# Altium PCB PCB_Flex_USB_v2.0.PcbDoc
Units mil, origin at the board's own origin, x right, y up, seen from the top; angles counter-clockwise.
Board outline 196.54 x 2163.96 mil, 2 copper layers (Top Layer, Bottom Layer), stack 3.756 mil thick; 4 components, 4 nets, 16 pads, 8 vias.
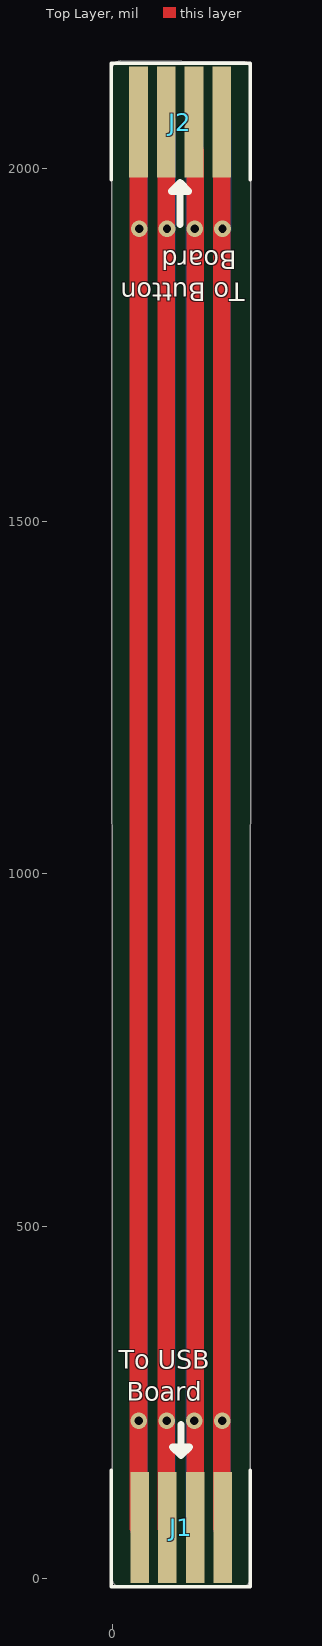
[diagram p0: Top Layer view]
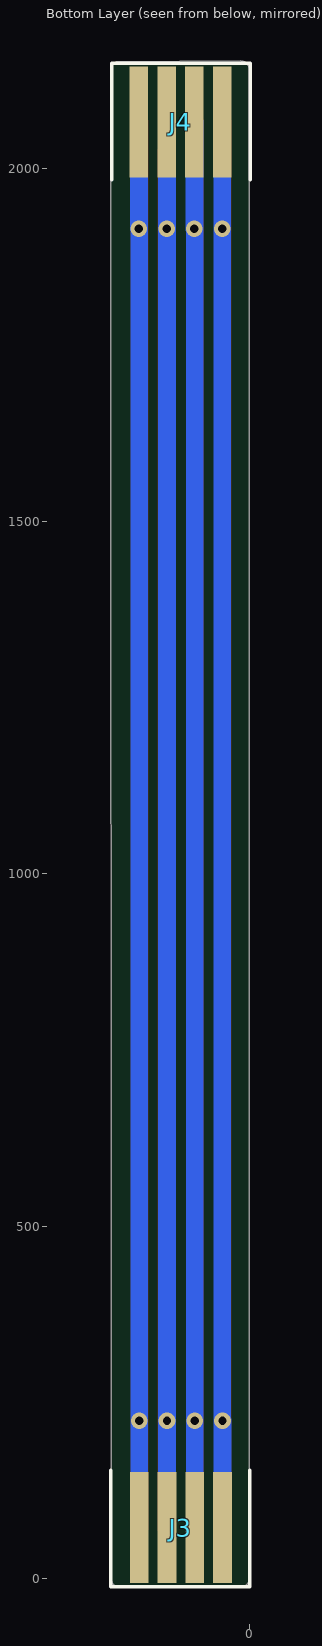
[diagram p1: Bottom Layer view, seen from below]

## Layer stack, top to bottom
Top Solder: solder mask 0.5, Solder Resist, Dk 3.5
Top Layer: signal copper 1.378
Dielectric 1: core 1, Polyimide, Dk 3.5
Bottom Layer: signal copper 1.378
Bottom Solder: solder mask 0.5, Solder Resist, Dk 3.5

## Board outline
0,0 ccw(c11.53,-0.03) 11.32,-11.55 184.44,-11.55 ccw(c184.24,-0.03) 195.77,0 196.15,2140.21 ccw(c184.91,2140.24) 185.11,2151.48 11.99,2152.4 ccw(c12.22,2139.8) -0.39,2139.77

## Design rules (kind name [scope] priority, off if disabled: settings)
Clearance [All] p1: gap=10 ignorepadtopadclearanceinfootprint=FALSE except(0: Arc-Hole Track-Hole SMDPad-Hole THPad-Hole Via-Hole Fill-Hole Poly-Hole Region-Hole Text-Hole)
HoleToHoleClearance [All] p1: gap=0 allowstackedmicrovias=TRUE
MinimumSolderMaskSliver [All] p1: minsoldermaskwidth=0
PolygonConnect [All] p1: connectstyle=Relief reliefconductorwidth=10 reliefentries=4 polygonreliefangle="90 Angle" airgapwidth=10
RoutingVias [All] p1: holewidth=11.81 width=23.62 viastyle="Through Hole" minholewidth=11.81 minwidth=23.62 maxholewidth=11.81 maxwidth=23.62
SilkToSilkClearance [All] p1: silktosilkclearance=0
SilkToSolderMaskClearance [IsPad] p1: minsilkscreentomaskgap=0 clearancetoexposedcopper=TRUE
SolderMaskExpansion [All] p1: expansion=4 istentingtop=FALSE
Width [All] p1: maxlimit=25 minlimit=10 preferedwidth=10 minimp=50.000000 maximp=50.000000 favimp=50.000000
26 further rules are at their usual default settings.

## Classes and differential pairs
component class Flex-LED: J1 J2

## Components (designator, comment, footprint, x,y, rotation, side; value= is the part's Value field where it differs from the comment)
J1 "1mm FPC" FPC-1MM-4P#1 97.88,67.72 r180 top locked
J2 "1mm FPC" FPC-1MM-4P#2 96.41,2070.72 r0 top locked
J3 "1mm FPC" FPC-1MM-4P#1 96.88,67.72 r0 bottom locked
J4 "1mm FPC" FPC-1MM-4P#2 97.41,2070.72 r180 bottom

## Footprints (in the part's own frame and the unit in brackets; to place one, negate y for a bottom-side part, rotate by r counter-clockwise, add the part's x,y. Pads: shape width x height; smd on the part's side, far side on the other; paste and mask are expansions set on the pad)
FPC-1MM-4P#1 [mm]
  rect 0.67x4 smd paste+0: 1(-1.5,-0.127) 2(-0.5,-0.127) 3(0.5,-0.127) 4(1.5,-0.127)
  silkscreen extent -2.48,-2.2 2.52,2
FPC-1MM-4P#2 [mm]
  rect 0.67x4 smd paste+0: 1(1.5,-0.127) 2(0.5,-0.127) 3(-0.5,-0.127) 4(-1.5,-0.127)
  silkscreen extent -2.48,-2.2 2.52,2

## Part data
J1 J2 J3 J4: library part FPC-1mm-4P, "1mm Pitch 4P FPC"

## Via types
v1: diameter 23.62, hole 11.81, Top Layer to Bottom Layer, tented both sides, 8 vias

## Nets (pads, with @x,y where several pads share a name; then routed paths per layer and width w, separated by ;. In a path a pad name is that pad's centre, name@x,y a point inside that pad or via, vN(x,y) a via of type N, cw(c..) or ccw(c..) an arc to the next point about the centre after c; other vN are vias at no path point)
NetJ1_1: J1.1 J2.1 J3.4 J4.4 | length 4142.9
  Top Layer w20: J1.1@155.47,72.19 J1.1@156.94,70.72 ; J2.1 J2.1@155.47,2068.72
  Top Layer w25: J1.1@155.47,72.19 J2.1
  Bottom Layer w25: J3.4 v1(155.89,224.04) 155.94,1914.4 J4.4@155.94,2065.72 ; v1@156.47,1914.4 J4.4
  other v1: 156.51,1914.4
NetJ1_2: J1.2 J2.2 J3.3 J4.3 | length 4100.9
  Top Layer w20: J2.2@116.1,2026.72 J2.2@117.57,2025.24
  Top Layer w25: J1.2@117.57,70.72 J2.2@117.57,2025.24
  Bottom Layer w25: J3.3 v1(116.52,224.04) 116.57,1914.4 J4.3@116.57,2065.72 ; v1(117.14,1914.4) J4.3
NetJ1_3: J1.3 J2.3 J3.2 J4.2 | length 4147.9
  Top Layer w20: J1.3@76.73,72.19 J1.3@78.2,70.72 ; J2.3 J2.3@76.73,2073.72
  Top Layer w25: J1.3@76.73,72.19 76.73,568.04 76.73,1914.4 J2.3
  Bottom Layer w25: J3.2 77.2,224.04 77.2,1914.4 J4.2@77.2,2065.72 ; v1(77.77,1914.4) J4.2
  other v1: 77.15,224.04
NetJ1_4: J1.4 J2.4 J3.1 J4.1 | length 4067.3
  Top Layer w20: J1.4@37.36,72.19 J1.4@38.83,70.72 ; J2.4 J2.4@37.36,2068.72
  Top Layer w25: J1.4@37.36,72.19 J2.4
  Bottom Layer w25: J3.1 v1(37.78,224.04) ; J3.1@38.36,148.38 38.36,224.04 38.36,1914.4 J4.1
  other v1: 38.4,1914.4

## Polygon pours and split planes (outlines as drawn)
no net on Fabrication info "NONET_L-01_P-001" (solid): 0.41,1972.43 0.87,2140.58 cw(c12.23,2138.15) 12.51,2149.77 185.04,2150 cw(c185.48,2138.72) 196.77,2139.16 196.77,1972.43
no net on Fabrication info "NONET_L-01_P-001" (solid): -0.2,166 0.25,-2.15 ccw(c11.61,0.28) 11.9,-11.33 184.43,-11.57 ccw(c184.87,-0.28) 196.15,-0.73 196.15,166

## Silkscreen, mask and mechanical layers (free items; w line width, h text height)
Top Overlay:
  lines w10: 96.47,1920.72 96.47,1964.72 ; 97.83,218.72 97.83,174.72 ; 97.83,174.72 85.83,186.72 109.83,186.72 97.83,174.72 ; 84.47,1967.72 96.47,1979.72 108.47,1967.72 84.47,1967.72
  text "To Button /  Board" at 188,1892.5 h45 r180
  text "To USB /  Board" at 9,243.41 h45
Board Outline:
  the board outline again, w10
Fabrication info:
  drawing of 195 lines, arcs and shapes, not listed
  text "Layer" at 2667.87,2209.04 h60
  text "Name" at 3077.78,2209.04 h60
  text "Material" at 4007.53,2209.04 h60
  text "Thickness" at 4867.3,2209.04 h60
  text "Constant" at 5517.13,2209.04 h60
  text "Board Layer Stack" at 6086.99,2209.04 h60
  text "Top Overlay" at 3077.78,2089.04 h60
  text "Stiffener Area: 4.5mm" at 471.78,2033.04 h60
  text "Top Solder" at 3077.78,1969.04 h60
  text "Solder Resist" at 4007.53,1969.04 h60
  text "0.50mil" at 4867.3,1969.04 h60
  text "3.5" at 5517.13,1969.04 h60
  text "1" at 2667.87,1849.04 h60
  text "Top Layer" at 3077.78,1849.04 h60
  text "1.38mil" at 4867.3,1849.04 h60
  text "Dielectric 1" at 3077.78,1729.04 h60
  text "Polyimide" at 4007.53,1729.04 h60
  text "1.00mil" at 4867.3,1729.04 h60
  text "3.5" at 5517.13,1729.04 h60
  text "2" at 2667.87,1609.04 h60
  text "Bottom Layer" at 3077.78,1609.04 h60
  text "1.38mil" at 4867.3,1609.04 h60
  text "Bottom Solder" at 3077.78,1489.04 h60
  text "Solder Resist" at 4007.53,1489.04 h60
  text "0.50mil" at 4867.3,1489.04 h60
  text "3.5" at 5517.13,1489.04 h60
  text "Note:" at 374.78,1466.04 h60
  text "Bottom Overlay" at 3077.78,1369.04 h60
  text "Stiffener Material: Polyimide" at 368.78,1351.03 h60
  text "Stiffener Thickness: 0.225 mm" at 370.05,1255.05 h60
  text "Total board thickness:" at 2667.87,1249.04 h60
  text "4.76mil" at 4867.3,1249.04 h60
  text "Stiffener side: Bottom side of PCB" at 369.1,1169.05 h60
  text "Total Thickness of PCB (0.3mm): Stiffener thickness + Layer Stackup thickness." at 291.72,742.01 h60
  text "Stiffener Area: 4.5mm" at 475.78,60.04 h60
Drill Drawing:
  lines w10: 147.12,2674 213.78,2674 213.78,2740.67 147.12,2740.67 147.12,2674
  lines w15: 87.33,2629 9280.8,2629 ; 87.33,2779 9280.8,2779 ; 638.2,2479 638.2,2929 ; 1118.08,2479 1118.08,2929 ; 2187.77,2479 2187.77,2929 ; 2693.65,2479 2693.65,2929 ; 3427.45,2479 3427.45,2929 ; 4927,2479 4927,2929 ; 5516.85,2479 5516.85,2929 ; 6262.65,2479 6262.65,2929 ; 7012.44,2479 7012.44,2929 ; 7878.2,2479 7878.2,2929 ; 87.33,2479 9280.8,2479 9280.8,2929 87.33,2929 87.33,2479
  text "Symbol" at 177.33,2824 h72
  text "Count" at 683.2,2824 h72
  text "Hole Size" at 1163.08,2824 h72
  text "Plated" at 2232.77,2824 h72
  text "Hole Type" at 2738.65,2824 h72
  text "Drill Layer Pair" at 3472.45,2824 h72
  text "Via/Pad" at 4972,2824 h72
  text "Pad Shape" at 5561.85,2824 h72
  text "Template" at 6307.65,2824 h72
  text "Hole Length" at 7057.44,2824 h72
  text "Routed Path Length" at 7923.2,2824 h72
  text "8" at 683.2,2674 h60
  text "11.81mil (0.300mm)" at 1163.08,2674 h60
  text "PTH" at 2232.77,2674 h60
  text "Round" at 2738.65,2674 h60
  text "Top Layer - Bottom Layer" at 3472.45,2674 h60
  text "Via" at 4972,2674 h60
  text "Rounded" at 5561.85,2674 h60
  text "v60h30m0mx0" at 6307.65,2674 h60
  text "-" at 7057.44,2674 h60
  text "-" at 7923.2,2674 h60
  text "8 Total" at 683.2,2524 h60

## Dimensions
-0.81,-11.02 to 11.99,2152.4 on Dimension
196.04,-11.02 to -0.81,-11.02 on Dimension